# Allegro board VESC_6_MK5_BRD_25_OCT_25_MP1.brd
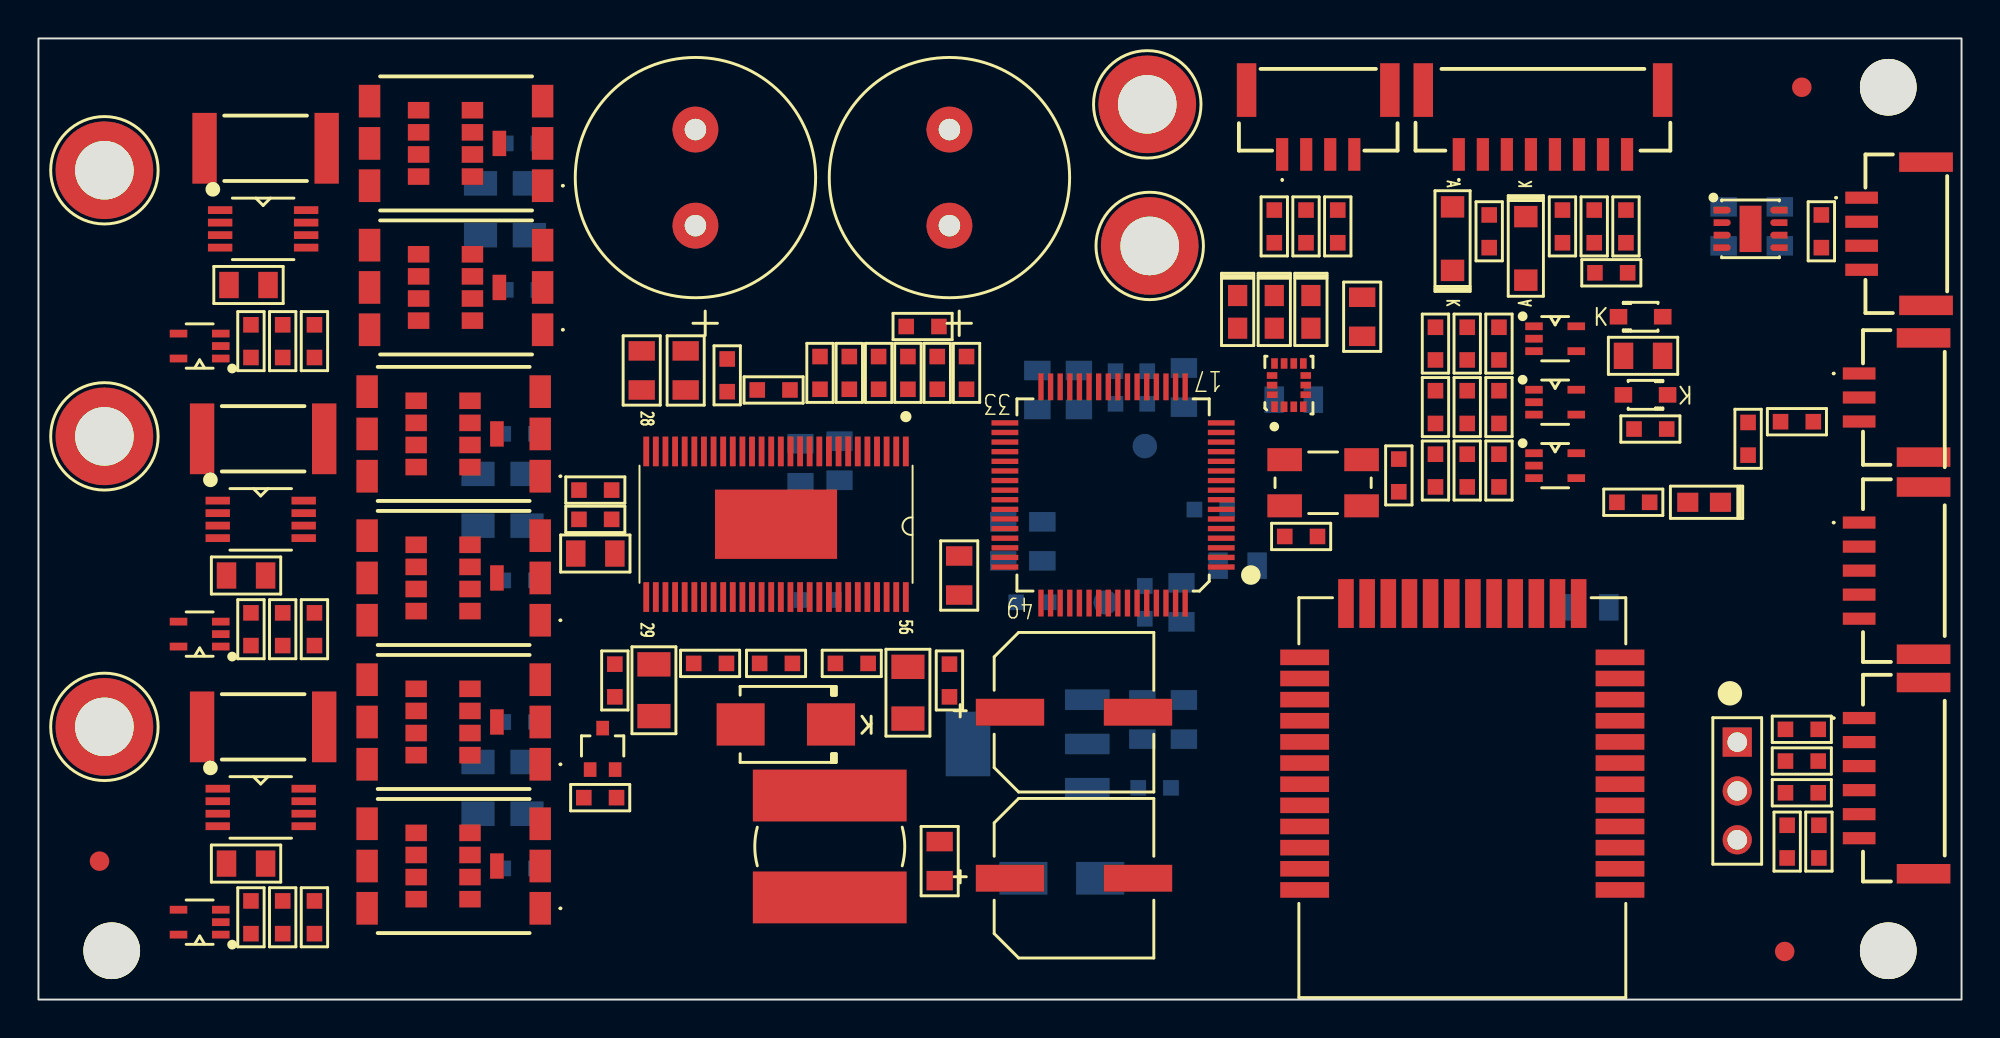
[diagram p0: board, top side]
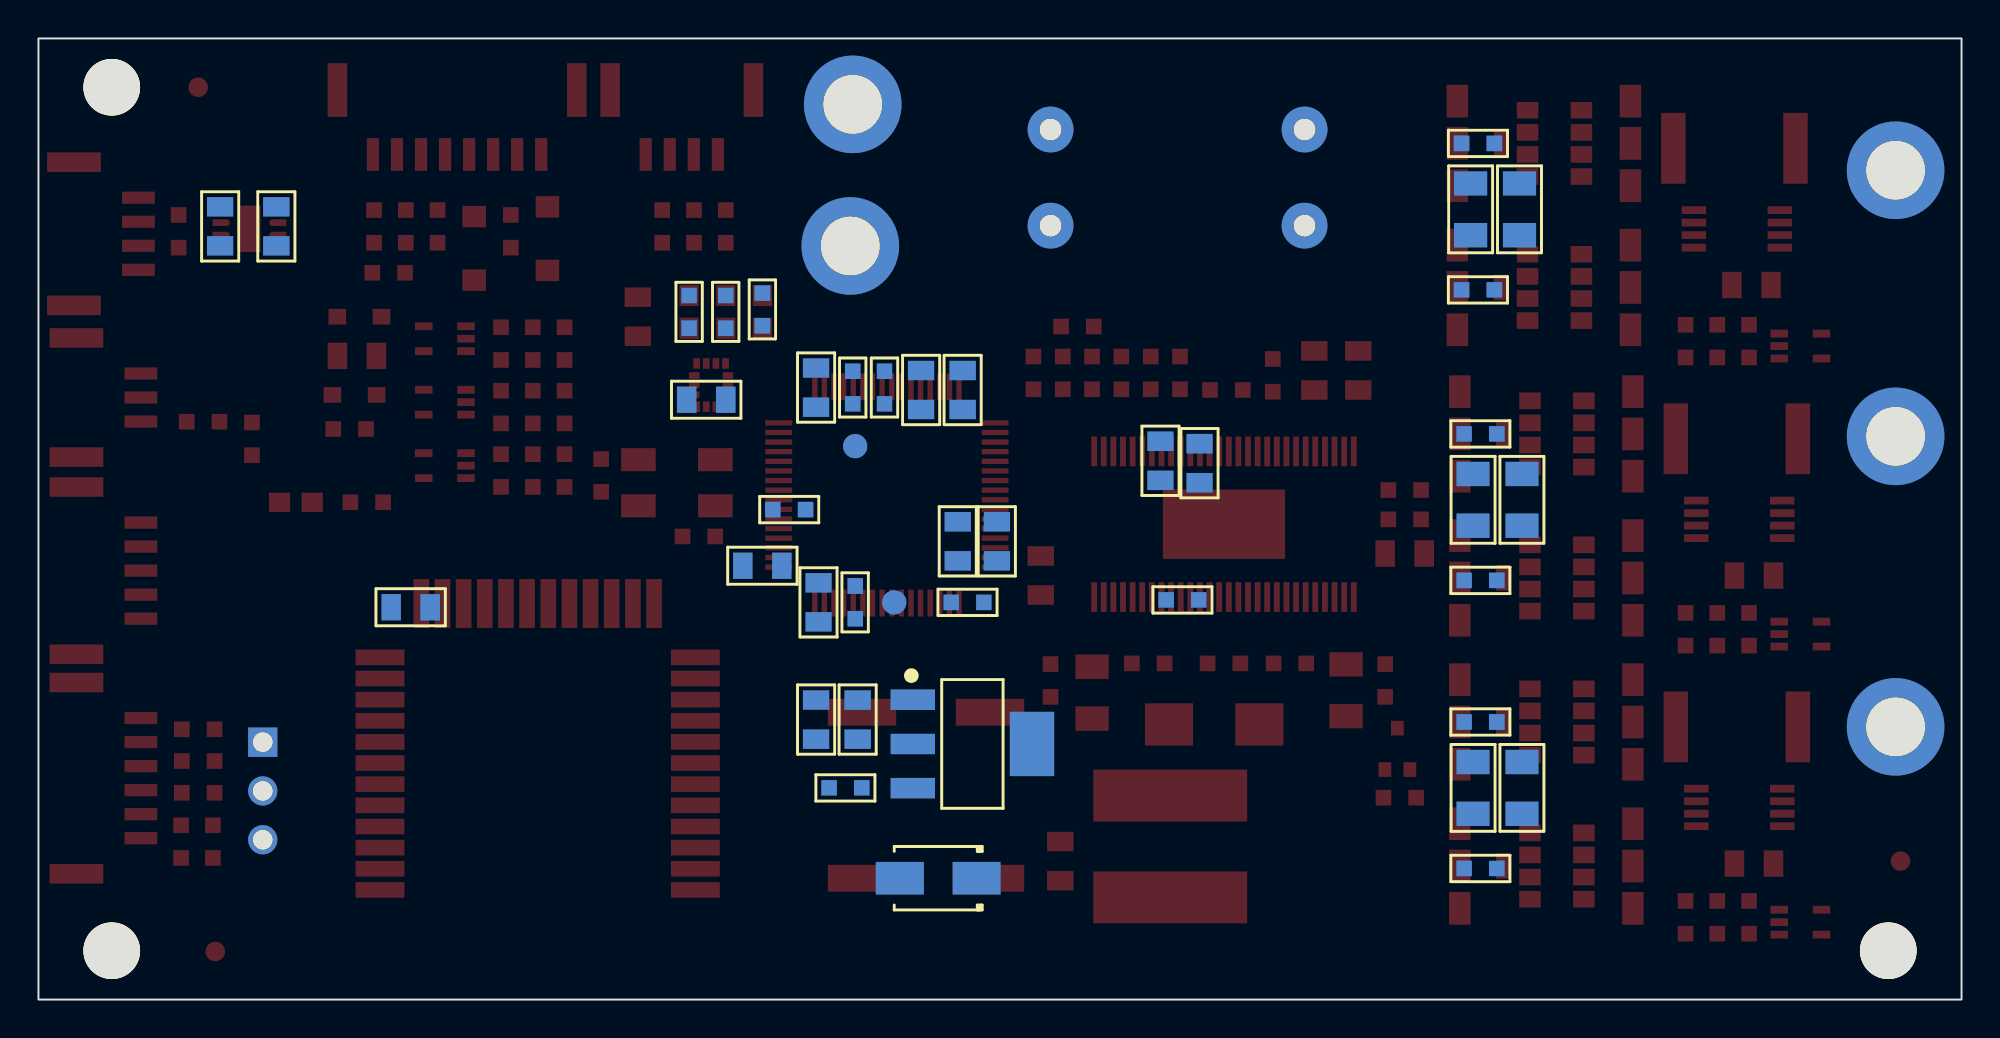
[diagram p1: board, bottom side, seen from below]

Outline 100 x 50 mm; copper layers: TOP, BOTTOM. Coordinates in mm from the lower left corner of the outline.
Outline path: rectangle 0,0 100,50

## Design rules (mm)
constraint set DEFAULT: min track width 0.203

## Placement (name value [footprint] x y rotation side)
C1  2.2uF  [0805]  83.44 33.49 0 top
C2  100nF  [0603]  79.25 40.22 90 top
C3  100nF  [0603]  92.58 8.22 270 top
C4  100nF  [0603]  88.9 29.17 90 top
C5  2.2uF  [0805]  68.83 35.52 90 top
C6  2.2uF  [0805]  65.28 31.2 180 bottom
C7  2.2uF  [0805]  90.55 40.22 90 bottom
C8  2.2uF  [0805]  87.63 40.22 90 bottom
C9  2.2uF  [0805]  80.65 20.41 180 bottom
C10  6.8nF  [0603]  45.97 35.01 0 top
C11  120pF  [0603]  46.74 32.6 90 top
C12  15nF  [0603]  47.37 16.6 90 top
C13  4.7uF_100V  [1206]  45.21 15.96 90 top
C14  100nF  [0603]  42.29 17.49 0 top
C15  220nF  [0603]  40.51 20.79 180 bottom
C16  2.2uF  [0805]  46.86 7.2 90 top
C17  47uF  [CAP_8X10]  53.85 14.95 0 top
C18  47uF  [CAP_8X10]  53.85 6.31 0 top
C19  22nF  [0603]  38.23 31.71 0 top
C20  220nF  [0603]  38.35 17.49 180 top
C21  2.2uF  [0805]  39.62 27.9 90 bottom
C22  2.2uF  [0805]  41.66 28.03 90 bottom
C23  220nF  [0603]  34.92 17.49 180 top
C24  2.2uF  [0805]  33.66 32.73 270 top
C25  2.2uF  [0805]  31.37 32.73 270 top
C26  4.7uF_100V  [1206]  32 16.09 90 top
C27  100nF  [0603]  75.95 27.52 90 top
C28  100nF  [0603]  75.95 30.82 90 top
C29  100nF  [0603]  75.95 34.13 90 top
C30  2.2u  [0603]  58.04 11.01 180 bottom
C31  2.2uF  [0805]  57.4 14.57 270 bottom
C32  2.2uF  [0805]  59.56 14.57 270 bottom
C33  4.7uF_100V  [1206]  22.99 41.11 90 bottom
C34  4.7uF_100V  [1206]  25.53 41.11 90 bottom
C35  4.7uF_100V  [1206]  22.86 26 90 bottom
C36  4.7uF_100V  [1206]  25.4 26 90 bottom
C37  4.7uF_100V  [1206]  25.4 11.01 90 bottom
C38  4.7uF_100V  [1206]  22.86 11.01 90 bottom
C39  2.2uF  [0805]  10.92 37.17 0 top
C40  2.2uF  [0805]  10.79 22.06 0 top
C41  2.2uF  [0805]  10.79 7.07 0 top
C42  1n  [0603]  12.7 34.25 90 top
C43  1n  [0603]  12.7 19.27 90 top
C44  1n  [0603]  12.7 4.28 90 top
C45  15nF  [0603]  11.05 34.25 90 top
C46  15nF  [0603]  11.05 19.27 90 top
C47  15nF  [0603]  11.05 4.28 90 top
C48  2.2uF  [0805]  28.96 23.2 180 top
C49  680uF_63V  [ECAP_TH_12P5X35MM]  34.16 42.76 90 top
C50  680uF_63V  [ECAP_TH_12P5X35MM]  47.37 42.76 90 top
C51  15PF  [0603]  70.74 27.27 90 top
C52  15PF  [0603]  65.66 24.09 180 top
C53  100nF  [0603]  60.96 25.49 0 bottom
C54  2.2uF  [0805]  59.44 20.66 90 bottom
C55  2.2uF  [0805]  52.2 23.84 270 bottom
C56  2.2uF  [0805]  50.16 23.84 90 bottom
C57  2.2uF  [0805]  62.36 22.57 0 bottom
C58  2.2uF  [0805]  59.56 31.84 270 bottom
C59  2.2uF  [0805]  51.94 31.71 270 bottom
C60  2.2uF  [0805]  54.1 31.71 90 bottom
C61  2.2uF  [0805]  47.88 22.06 270 top
D1  D_Schottky  [SOD_123]  73.53 39.59 270 top
D2  D_Schottky  [SOD_323]  83.31 35.52 0 top
D3  3.6V  [SOD_123]  77.34 39.08 90 top
D4  D_Schottky  [SOD_323]  83.57 31.46 180 top
D5  BLUE  [LED_0603]  66.17 35.78 90 top
D6  RED  [LED_0603]  62.36 35.78 90 top
D7  GREEN  [LED_0603]  64.26 35.78 90 top
D8  RED  [LED_0603]  86.61 25.87 0 top
D9  DIODE SCHOTTKY  [DO214AA]  38.86 14.31 180 top
D10  TVS_5V  [DO-214AC]  53.21 6.31 0 bottom
J3  DRV8301  [HTSSOP_56P_6X14MM]  38.35 24.73 270 top
J4  CON3  [HDR_1X3]  88.34 13.39 270 top
L1  22uH  [IND_7P8X7P8_SDR0805]  41.15 7.96 90 top
NOREF  -  [unnamed]  96.19 47.46 0 top
NOREF#2  -  [unnamed#2]  90.81 2.5 0 top
NOREF#3  -  [unnamed]  3.81 2.54 0 top
NOREF#4  -  [unnamed#2]  91.69 47.46 0 top
NOREF#5  -  [#3]  50.25 30 0 top
NOREF#6  -  [#3]  -1429.39 -1577.61 0 top
NOREF#7  -  [unnamed]  96.19 2.54 0 top
NOREF#8  -  [#3]  0 50 0 top
NOREF#9  -  [#3]  0 0 90 top
NOREF#10  -  [unnamed#2]  3.17 7.2 0 top
P1  SWD_VER  [CON_4P_VRT_BM04BGHSTB]  66.55 46.19 180 top
P2  HALL_ENC  [CON_6P_VRT_BM06BGHSTBT]  96.9 11.52 90 top
P3  COMM  [CON_8P_VRT_BM08BGHSTBT]  78.23 46.19 180 top
P4  SERVO  [CON_3P_VRT_BM03BGHSTB]  96.9 30.7 90 top
P5  SWD_VER  [CON_5P_VRT_BM05BGHSTBT]  96.9 22.31 90 top
P6  CAN  [CON_4P_VRT_BM04BGHSTB]  97.03 39.84 90 top
P7  SUPPLY  [TP_TH_120MILS]  57.78 39.21 0 top
P8  PH_A  [TP_TH_120MILS]  3.43 43.14 0 top
P9  PH_B  [TP_TH_120MILS]  3.43 29.3 0 top
P10  PH_C  [TP_TH_120MILS]  3.43 14.19 0 top
P11  GND  [TP_TH_120MILS]  57.66 46.57 0 top
Q1  DMN62D0UW-7  [SOT323_3P]  29.34 13.04 0 top
Q2  IRF7749  [IRF7749L1TRPBF]  21.72 37.05 180 top
Q3  IRF7749  [IRF7749L1TRPBF]  21.59 6.95 180 top
Q4  IRF7749  [IRF7749L1TRPBF]  21.59 21.93 180 top
Q5  IRF7749  [IRF7749L1TRPBF]  21.72 44.54 180 top
Q6  IRF7749  [IRF7749L1TRPBF]  21.59 29.43 180 top
Q7  IRF7749  [IRF7749L1TRPBF]  21.59 14.44 180 top
R1  0R,DNP  [0603]  64.26 40.22 270 top
R2  22R  [0603]  65.91 40.22 270 top
R3  22R  [0603]  67.56 40.22 270 top
R4  2k2  [0603]  91.69 10.76 0 top
R5  39k  [0603]  75.44 39.97 90 top
R6  2k2  [0603]  91.69 12.41 0 top
R7  2k2  [0603]  91.69 14.06 0 top
R8  10k  [0603]  90.93 8.22 270 top
R9  56k  [0603]  80.9 40.22 90 top
R10  220R  [0603]  83.82 29.68 0 top
R11  1k_PTC  [0603]  81.79 37.81 180 top
R12  1k_PTC  [0603]  82.55 40.22 270 top
R13  100R  [0603]  91.44 30.06 0 top
R14  1k  [0603]  66.17 35.78 270 bottom
R15  220R  [0603]  62.36 35.9 270 bottom
R16  220R  [0603]  64.26 35.78 270 bottom
R17  1k  [0603]  56.01 31.84 270 bottom
R18  1k  [0603]  51.69 20.66 180 bottom
R19  220R  [0603]  92.71 39.97 90 top
R20  1k  [0603]  82.93 25.87 180 top
R21  3.3k  [0603]  43.69 32.6 270 top
R22  220K  [0603]  48.26 32.6 270 top
R23  15k  [0603]  45.21 32.6 270 top
R24  18k  [0603]  42.16 32.6 90 top
R25  10k  [0603]  40.64 32.6 270 top
R26  10k  [0603]  35.81 32.47 270 top
R27  39k  [0603]  29.97 16.6 270 top
R28  2k2  [0603]  29.21 10.5 180 top
R29  39k_60V  [0603]  72.64 27.52 270 top
R30  39k_60V  [0603]  72.64 30.82 270 top
R31  39k_60V  [0603]  72.64 34.13 270 top
R32  2k2  [0603]  74.3 27.52 90 top
R33  2k2  [0603]  74.3 30.82 90 top
R34  2k2  [0603]  74.3 34.13 90 top
R35  4.7R  [0603]  25.02 21.81 180 bottom
R36  4.7R  [0603]  25.15 36.92 180 bottom
R37  4.7R  [0603]  25.02 6.82 180 bottom
R38  0.0005R  [2512]  11.81 44.29 0 top
R39  0.0005R  [2512]  11.68 29.17 0 top
R40  0.0005R  [2512]  11.68 14.19 0 top
R41  4.7R  [0603]  25.15 44.54 180 bottom
R42  4.7R  [0603]  25.02 29.43 180 bottom
R43  4.7R  [0603]  25.02 14.44 180 bottom
R44  1k  [0603]  14.35 34.25 90 top
R45  1k  [0603]  14.35 19.27 90 top
R46  1k  [0603]  14.35 4.28 90 top
R47  NTC_10K  [0603]  28.96 26.51 180 top
R48  10k  [0603]  28.96 24.98 0 top
R49  0R  [0603]  57.53 20.66 90 bottom
R50  0R  [0603]  57.66 31.84 270 bottom
TP1  T POINT R  [TP_50MIL]  57.53 28.79 0 bottom
TP2  T POINT R  [TP_50MIL]  55.5 20.66 0 bottom
U2  BMI270  [LGA_14P_2P5X3MM]  65.02 31.97 90 top
U3  TJA1051TK3  [VSON_8P_3X3MM_TP]  89.03 40.09 270 top
U4  Core51822(B)  [BLE_36P_MOD_17X20P8MM_NRF_CORE51822B]  74.04 10.5 180 top
U5  TC2117  [SOT223_4P]  51.43 13.3 180 bottom
U6  MC74VHC1GT66  [SC70_5P]  78.87 27.78 0 top
U7  MC74VHC1GT66  [SC70_5P]  78.87 31.08 0 top
U8  MC74VHC1GT66  [SC70_5P]  78.87 34.38 0 top
U9  AD8418  [MSOP8]  11.68 40.09 0 top
U10  AD8418  [MSOP8]  11.56 24.98 0 top
U11  AD8418  [MSOP8]  11.56 10 0 top
U12  MC74VHC1GT66  [SC70_5P]  8.38 34 180 top
U13  MC74VHC1GT66  [SC70_5P]  8.38 19.01 180 top
U14  MC74VHC1GT66  [SC70_5P]  8.38 4.03 180 top
U15  STM32F405RGT6_LQFP64  [LQFP64_10X10MM]  55.88 26.25 180 top
Y1  ABM3B-8.000MHZ  [XTAL_4P_5X3P2MM_ABM3B]  66.8 26.89 0 top

## Library data of the parts
C1-C16 C19-C48 C51-C61 = CAP NP
C17 C18 C49 C50 = CAP POL_0
D1 D2 D4 = DIODE SCHOTTKY_0
D3 = DIODE31_0
D5-D8 = LED_3
D9 = DIODE SCHOTTKY_1
D10 = DIODE TVS_0
J3 = CON58_3
J4 = CON3_1
L1 = INDUCTOR
P1 = CON6A_8
P2 = CON6_0
P3 = CON8
P4 = CON3
P5 = CON5
P6 = CON4_0
P7-P11 = CON1
Q1 = MOSFET N_3
Q2-Q7 = MOSFET N_5
R1-R37 R41-R50 = R
R38-R40 = R_3
TP1 TP2 = T POINT R
U2 = CON14C_1
U3 = CON8_8
U4 = CON28C_9
U5 = CON2AP_4
U6-U8 U12-U14 = CON6A_5
U9-U11 = CON8A_5
U15 = CON60_5
Y1 = CRYSTAL1-4/SM_9

## Footprints (pads in the part's own frame, mm; a bottom-side part is the same pattern mirrored in y, then rotated)
0603
  rect 0.813x0.813 smd: 1(-0.851,0) 2(0.851,0)
0805
  rect 1.016x1.372 smd: 1(-1.016,0) 2(1.016,0)
1206
  rect 1.27x1.727 smd: 1(-1.346,0) 2(1.346,0)
2512
  rect 1.27x3.683 smd: 1(-3.175,0) 2(3.175,0)
BLE_36P_MOD_17X20P8MM_NRF_CORE51822B
  rect 2.54x0.813 smd: 1(-8.2,4.8) 2(-8.2,3.7) 3(-8.2,2.6) 4(-8.2,1.5) 5(-8.2,0.4) 6(-8.2,-0.7) 7(-8.2,-1.8) 8(-8.2,-2.9) 9(-8.2,-4) 10(-8.2,-5.1) 11(-8.2,-6.2) 12(-8.2,-7.3) 25(8.2,-7.3) 26(8.2,-6.2) 27(8.2,-5.1) 28(8.2,-4) 29(8.2,-2.9) 30(8.2,-1.8) 31(8.2,-0.7) 32(8.2,0.4) 33(8.2,1.5) 34(8.2,2.6) 35(8.2,3.7) 36(8.2,4.8)
  rect 0.813x2.54 smd: 13(-6.05,-10.1) 14(-4.95,-10.1) 15(-3.85,-10.1) 16(-2.75,-10.1) 17(-1.65,-10.1) 18(-0.55,-10.1) 19(0.55,-10.1) 20(1.65,-10.1) 21(2.75,-10.1) 22(3.85,-10.1) 23(4.95,-10.1) 24(6.05,-10.1)
CAP_8X10
  rect 3.556x1.397 smd: N(3.328,0) P(-3.328,0)
CON_3P_VRT_BM03BGHSTB
  rect 1.016x2.794 smd: (-2.475,-1.125) (3.725,-1.125)
  rect 0.635x1.702 smd: 1(1.875,2.225) 2(0.625,2.225) 3(-0.625,2.225)
CON_4P_VRT_BM04BGHSTB
  rect 1.016x2.794 smd: (-3.725,-1.125) (3.725,-1.125)
  rect 0.635x1.702 smd: 1(1.875,2.225) 2(0.625,2.225) 3(-0.625,2.225) 4(-1.875,2.225)
CON_5P_VRT_BM05BGHSTBT
  rect 1.016x2.794 smd: (-4.35,-1.125) (4.35,-1.125)
  rect 0.635x1.702 smd: 1(2.5,2.225) 2(1.25,2.225) 3(0,2.225) 4(-1.25,2.225) 5(-2.5,2.225)
CON_6P_VRT_BM06BGHSTBT
  rect 1.016x2.794 smd: (-4.975,-1.125) (4.975,-1.125)
  rect 0.635x1.702 smd: 1(3.125,2.225) 2(1.875,2.225) 3(0.625,2.225) 4(-0.625,2.225) 5(-1.875,2.225) 6(-3.125,2.225)
CON_8P_VRT_BM08BGHSTBT
  rect 1.016x2.794 smd: (-6.225,-1.125) (6.225,-1.125)
  rect 0.635x1.702 smd: 1(4.375,2.225) 2(3.125,2.225) 3(1.875,2.225) 4(0.625,2.225) 5(-0.625,2.225) 6(-1.875,2.225) 7(-3.125,2.225) 8(-4.375,2.225)
DO214AA
  rect 2.5x2.2 smd: A(2.35,0) K(-2.35,0)
DO-214AC
  rect 2.5x1.7 smd: A(2,0) K(-2,0)
ECAP_TH_12P5X35MM
  round 2.388 hole 1.118: N(2.5,0) P(-2.5,0)
HDR_1X3
  rect 1.524x1.524 hole 1.016: 1(0,0)
  round 1.524 hole 1.016: 2(2.54,0) 3(5.08,0)
HTSSOP_56P_6X14MM
  rect 1.549x0.305 smd: 1(-3.788,6.75) 2(-3.788,6.25) 3(-3.788,5.75) 4(-3.788,5.25) 5(-3.788,4.75) 6(-3.788,4.25) 7(-3.788,3.75) 8(-3.788,3.25) 9(-3.788,2.75) 10(-3.788,2.25) 11(-3.788,1.75) 12(-3.788,1.25) 13(-3.788,0.75) 14(-3.788,0.25) 15(-3.788,-0.25) 16(-3.788,-0.75) 17(-3.788,-1.25) 18(-3.788,-1.75) 19(-3.788,-2.25) 20(-3.788,-2.75) 21(-3.788,-3.25) 22(-3.788,-3.75) 23(-3.788,-4.25) 24(-3.788,-4.75) 25(-3.788,-5.25) 26(-3.788,-5.75) 27(-3.788,-6.25) 28(-3.788,-6.75) 29(3.788,-6.75) 30(3.788,-6.25) 31(3.788,-5.75) 32(3.788,-5.25) 33(3.788,-4.75) 34(3.788,-4.25) 35(3.788,-3.75) 36(3.788,-3.25) 37(3.788,-2.75) 38(3.788,-2.25) 39(3.788,-1.75) 40(3.788,-1.25) 41(3.788,-0.75) 42(3.788,-0.25) 43(3.788,0.25) 44(3.788,0.75) 45(3.788,1.25) 46(3.788,1.75) 47(3.788,2.25) 48(3.788,2.75) 49(3.788,3.25) 50(3.788,3.75) 51(3.788,4.25) 52(3.788,4.75) 53(3.788,5.25) 54(3.788,5.75) 55(3.788,6.25) 56(3.788,6.75)
  rect 3.607x6.35 smd: 57(0,0)
IND_7P8X7P8_SDR0805
  rect 2.7x8 smd: 1(-2.65,0) 2(2.65,0)
IRF7749L1TRPBF
  rect 1.118x1.702 smd: 1(-4.5,2.2) 2(-4.5,0) 3(-4.5,-2.2) 4(4.5,-2.2) 5(4.5,0) 6(4.5,2.2)
  rect 0.711x1.321 smd: 7(-2.25,0)
  rect 1.118x0.864 smd: 8(-0.85,1.725) 9(-0.85,0.575) 10(-0.85,-0.575) 11(-0.85,-1.725) 12(1.95,-1.725) 13(1.95,-0.575) 14(1.95,0.575) 15(1.95,1.725)
LED_0603
  rect 1.1x1 smd: A(-0.85,0) K(0.85,0)
LGA_14P_2P5X3MM
  rect 0.55x0.35 smd: 1(-1.125,0.75) 2(-1.125,0.25) 3(-1.125,-0.25) 4(-1.125,-0.75) 8(1.125,-0.75) 9(1.125,-0.25) 10(1.125,0.25) 11(1.125,0.75)
  rect 0.35x0.55 smd: 5(-0.5,-0.875) 6(0,-0.875) 7(0.5,-0.875) 12(0.5,0.875) 13(0,0.875) 14(-0.5,0.875)
LQFP64_10X10MM
  rect 1.397x0.279 smd: 1(-5.625,3.749) 2(-5.625,3.251) 3(-5.625,2.751) 4(-5.625,2.25) 5(-5.625,1.75) 6(-5.625,1.25) 7(-5.625,0.749) 8(-5.625,0.249) 9(-5.625,-0.249) 10(-5.625,-0.749) 11(-5.625,-1.25) 12(-5.625,-1.75) 13(-5.625,-2.25) 14(-5.625,-2.751) 15(-5.625,-3.251) 16(-5.625,-3.749) 33(5.625,-3.749) 34(5.625,-3.251) 35(5.625,-2.751) 36(5.625,-2.25) 37(5.625,-1.75) 38(5.625,-1.25) 39(5.625,-0.749) 40(5.625,-0.249) 41(5.625,0.249) 42(5.625,0.749) 43(5.625,1.25) 44(5.625,1.75) 45(5.625,2.25) 46(5.625,2.751) 47(5.625,3.251) 48(5.625,3.749)
  rect 0.279x1.397 smd: 17(-3.749,-5.625) 18(-3.251,-5.625) 19(-2.751,-5.625) 20(-2.25,-5.625) 21(-1.75,-5.625) 22(-1.25,-5.625) 23(-0.749,-5.625) 24(-0.249,-5.625) 25(0.249,-5.625) 26(0.749,-5.625) 27(1.25,-5.625) 28(1.75,-5.625) 29(2.25,-5.625) 30(2.751,-5.625) 31(3.251,-5.625) 32(3.749,-5.625) 49(3.749,5.625) 50(3.251,5.625) 51(2.751,5.625) 52(2.25,5.625) 53(1.75,5.625) 54(1.25,5.625) 55(0.749,5.625) 56(0.249,5.625) 57(-0.249,5.625) 58(-0.749,5.625) 59(-1.25,5.625) 60(-1.75,5.625) 61(-2.25,5.625) 62(-2.751,5.625) 63(-3.251,5.625) 64(-3.749,5.625)
MSOP8
  rect 1.27x0.406 smd: 1(-2.235,0.975) 2(-2.235,0.325) 3(-2.235,-0.325) 4(-2.235,-0.975) 5(2.235,-0.975) 6(2.235,-0.325) 7(2.235,0.325) 8(2.235,0.975)
SC70_5P
  rect 0.914x0.406 smd: 1(-1.098,0.648) 2(-1.098,0) 3(-1.098,-0.648) 4(1.098,-0.648) 5(1.098,0.648)
SOD_123
  rect 1.118x1.219 smd: A(-1.652,0) K(1.652,0)
SOD_323
  rect 0.914x0.813 smd: A(1.15,0) K(-1.15,0)
SOT223_4P
  rect 2.311x1.067 smd: 1(-3.1,2.3) 2(-3.1,0) 3(-3.1,-2.3)
  rect 2.311x3.353 smd: 4(3.1,0)
SOT323_3P
  rect 0.66x0.762 smd: 1(-0.65,-1.078) 2(0.65,-1.078) 3(0,1.078)
TP_50MIL
  round 1.27 smd: 1(0,0)
TP_TH_120MILS
  round 5.08 hole 3.048: 1(0,0)
unnamed
  round 2.946 hole 3.2 unplated: (0,0)
unnamed#2
  round 1.016 smd: 1(0,0)
VSON_8P_3X3MM_TP
  custom 0.35x0.892 smd: 1(-0.975,-1.475) 2(-0.325,-1.475) 3(0.325,-1.475) 4(0.975,-1.475) 5(0.975,1.475) 6(0.325,1.475) 7(-0.325,1.475) 8(-0.975,1.475)
  rect 2.413x1.143 smd: 9(0,0)
XTAL_4P_5X3P2MM_ABM3B
  rect 1.8x1.2 smd: 1(-2,-1.2) 2(2,-1.2) 3(2,1.2) 4(-2,1.2)

## Nets
+5V: C8.1 C16.1 C17.P C18.P C30.2 D10.K(CATHODE) J4.1 L1.1 P3.1 P4.2 P6.4 Q1.1 R1.2 R24.2 U3.3 U5.3(VI)
VCC: C5.1 C6.1 C7.1 C9.2 C31.2 C32.2 C39.2 C40.2 C41.2 C54.2 C55.2 C56.1 C57.2 C58.2 C59.2 D5.A J3.49 J4.3 P3.2 P5.5 R8.2 R17.2 R18.2 R47.2 U2.5(VDDIO) U2.8 U2.12 U3.5(VIO) U4.12(VCC) U5.2 U5.4 U6.5(VCC) U7.5(VCC) U8.5(VCC) U9.6(VS) U9.7 U10.6(VS) U10.7 U11.6(VS) U11.7 U12.5(VCC) U13.5(VCC) U14.5(VCC) U15.1 U15.13 U15.19 U15.32 U15.48 U15.64
0: C1.1 C2.1 C3.2 C4.1 C5.2 C6.2 C7.2 C8.2 C9.1 C10.2 C11.2 C12.1 C13.1 C16.2 C17.N C18.N C21.1 C22.1 C24.1 C25.1 C26.1 C30.1 C31.1 C32.1 C51.1 C52.1 C53.1 C54.1 C55.1 C56.2 C57.1 C58.1 C59.1 C60.2 C61.2 D3.A D4.A D8.K(CATHODE) D9.A D10.A J3.28 J3.30 J3.31 J3.32 J3.33 J3.57 P1.4 P2.1 P3.3 P4.1 P5.3 P6.1 R14.2 R15.2 R16.2 R21.1 R22.1 R25.1 R26.1 R28.2 R32.2 R33.2 R34.2 R49.1 U2.1 U2.6 U2.7 U3.2 U3.8 U3.9 U4.1 U4.11 U5.1 U6.2 U6.3 U7.2 U7.3 U8.2 U8.3 U15.12 U15.18 U15.63(VSS_2) Y1.2 Y1.4
BT_HV: C13.2 C26.2 C33.1 C34.1 C35.1 C36.1 C37.1 C38.1 C49.P C50.P J3.29 J3.53 J3.54 P7.1 Q2.1 Q2.2 Q2.3 Q2.4 Q2.5 Q2.6 Q3.1 Q3.2 Q3.3 Q3.4 Q3.5 Q3.6 Q4.1 Q4.2 Q4.3 Q4.4 Q4.5 Q4.6 R27.1
C_A: R44.2 U9.5
C_B: R45.2 U10.5
C_C: R46.2 U11.5
CONN_SW: P3.8 R12.1
EN_BUCK: C2.2 D3.K J3.55 R5.2 R9.2
PH_A: P8.1 R38.1 U9.1
PH_B: P9.1 R39.1 U10.1
PH_C: P10.1 R40.1 U11.1
SH_A: C15.2 D1.A J3.46 Q2.8 Q2.9 Q2.10 Q2.11 Q2.12 Q2.13 Q2.14 Q2.15(S8) Q5.1 Q5.2 Q5.3 Q5.4 Q5.5 Q5.6 R29.1 R38.2 U9.8
SHUTDOWN: R10.1 U15.25
N113958: J4.2 P2.6 R4.1 R6.1 R7.1
N114102: P2.2 R7.2 U15.39
N114106: P2.3 R6.2 U15.38
N114110: P2.4 R4.2 U15.37
N114114: C3.1 P2.5 R8.1 U15.24
N119424: P4.3 R13.2
N119428: C4.2 R13.1 U15.58
N316048: P5.4 U15.49
N316068: P5.2 U15.46
N316080: C53.2 P5.1 U15.7
N316972: D5.K(CATHODE) R14.1
N317032: D6.A U15.27
N317036: D6.K(CATHODE) R15.1
N317096: D7.A U15.26
N317100: D7.K(CATHODE) R16.1
N320425: D2.K(CATHODE) R9.1 R11.2
N320494: R11.1 R12.2
N320696: C1.2 D2.A D4.K(CATHODE) R10.2
N321457: D1.K(CATHODE) R5.1
N379550: C60.1 U15.31
N379578: C61.1 U15.47
N382210: C12.2 J3.56
N382270: C10.1 R23.1
N382306: J3.3(VSENSE) R21.2 R24.1
N382374: C11.1 J3.2 R23.2
N382386: J3.1 R22.2
N382652: C14.2 J3.52
N382656: C14.1 D9.K(CATHODE) J3.50 J3.51 L1.2
N382740: J3.7 R25.2
N382848: C15.1 J3.48
N382956: C21.2 C22.2 J3.13
N383040: C19.2 J3.14
N383044: C20.1 J3.43
N383064: C19.1 J3.15
N383228: C23.1 J3.38
N383264: Q1.3 R27.2
N383316: C24.2 J3.23
N383358: C25.2 J3.24 J3.27
N399081: Q5.7 R41.2
N399151: Q2.7 R36.2
N405714: Q4.7 R35.2
N405958: Q6.7 R42.2
N406713: Q3.7 R37.2
N406957: Q7.7 R43.2
N413411: C45.1 U12.2
N415177: C46.1 U13.2
N415727: C47.1 U14.2
N421403: P1.1(VBUS) R1.1
N421435: P1.2 R2.1
N421455: R2.2 U15.44
N421467: P1.3 R3.1
N421471: R3.2 U15.45
N440238: C52.2 U15.5 Y1.1
N440256: C51.2 U15.6 Y1.3
N453854: C27.2 U6.1
N453874: C28.2 U7.1
N453894: C29.2 U8.1
N475951: R49.2 TP2.1(TP) U15.60
N476249: R50.2 TP1.1(TP) U15.28
N483635: J3.47 R36.1
N483651: J3.45 R41.1
N483659: C33.2 C34.2 C35.2 C36.2 C37.2 C38.2 C39.1 C40.1 C41.1 C42.2 C43.2 C44.2 C45.2 C46.2 C47.2 C48.2 C49.N C50.N J3.34 J3.39 J3.44 P11.1 Q5.8 Q5.9 Q5.10 Q5.11 Q5.12 Q5.13 Q5.14 Q5.15(S8) Q6.8 Q6.9 Q6.10 Q6.11 Q6.12 Q6.13 Q6.14 Q6.15(S8) Q7.8 Q7.9 Q7.10 Q7.11 Q7.12 Q7.13 Q7.14 Q7.15(S8) R48.1 U9.2 U9.3 U10.2 U10.3 U11.2 U11.3 U12.3 U13.3 U14.3
N488558: P6.3 R19.2 U3.7
N488562: P6.2 R19.1 U3.6
N488738: R18.1 U2.13 U15.50
N488742: R17.1 R50.1 U2.14
N490262: U3.1 U15.62
N490274: U3.4 U15.61
N490496: U4.32 U15.20
N490506: U4.31 U15.33
N490510: U4.15 U15.52
N490514: U4.16 U15.53
N490522: R20.2 U4.17
N492162: P3.7 U15.22
N492166: P3.6 U15.23 U15.29
N492170: P3.5 U15.30
N492258: P3.4 U15.21
N494356: J3.17 U15.41
N494360: J3.19 U15.42
N494364: J3.21 U15.43
N494368: J3.18 U15.34
N494372: J3.20 U15.35
N494376: J3.22 U15.36
N494756: J3.6 U15.59
N494760: J3.16 R26.2 U15.57
N495156: J3.10 U15.55
N495160: J3.9 U15.56
N495164: J3.11 U15.51
N495168: J3.8 U15.40
N495709: C27.1 R29.2 R32.1 U15.14
N495713: C28.1 R30.2 R33.1 U15.15
N495717: C29.1 R31.2 R34.1 U15.16
N495721: Q1.2(S) R28.1 U15.11
N495725: U6.4 U7.4 U8.4 U15.2
N495729: U12.4 U13.4 U14.4 U15.54
N495741: C42.1 R44.1 U12.1 U15.8
N495753: C43.1 R45.1 U13.1 U15.9
N495765: C44.1 R46.1 U14.1 U15.10
N495777: C48.1 R47.1 R48.2 U15.17
N496269: J3.42 R35.1
N496273: C20.2 J3.41 Q4.8 Q4.9 Q4.10 Q4.11 Q4.12 Q4.13 Q4.14 Q4.15(S8) Q6.1 Q6.3 Q6.4 Q6.5 Q6.6 R30.1 R39.2 U10.8
N496277: J3.40 R42.1
N496285: J3.37 R37.1
N496289: C23.2 J3.36 Q3.8 Q3.9 Q3.10 Q3.11 Q3.12 Q3.13 Q3.14 Q3.15(S8) Q7.1 Q7.2 Q7.3 Q7.4 Q7.5 Q7.6 R31.1 R40.2 U11.8
N496293: J3.35 R43.1
N4906060: D8.A R20.1

Pads without a net: J3 4 5 12 25 26; NOREF#2 1; NOREF#4 1; NOREF#10 1; Q6 2; U2 2 3 4 9 10 11; U4 2 3 4 5 6 7 8 9 10 13 14 18 19 20 21 22 23 24 25 26 27 28 29 30 33 34 35 36; U9 4; U10 4; U11 4; U15 3 4

## Text on the board
User.9: NOTES : | 1.BASE MATERIAL : FR4 | 2.FLAMMABILITY : UL 94V-0 | 3.SURFACE : ENIG | 4.SOLDER MASK : GREEN | 5.SILKSCREEN COLOR : WHITE | 6.MANUFACTURE LOGO : NO | 2 LAYER STACKUP
User.38: 1.6 MM | +/-10 % | 1.0 OZ | LAYER 1 TOP | LAYER 2 BOTTOM | LAYER
User.45: FIGURE | FINISHED_SIZE | 12.0 | 144.0 | DRILL CHART: TOP to BOTTOM | ALL UNITS ARE IN MILS | TOLERANCE_DRILL | +3.0/-12.0 | +2.0/-2.0 | PLATED | NON-PLATED | QTY | 205 | 4
